# Altium PCB ScreenerMobo.PcbDoc (part 3 of 5)
Units mm, origin at the board's own origin, x right, y up, seen from the top; angles counter-clockwise.
Board outline 145 x 180 mm, 2 copper layers (Top Layer, Bottom Layer); 434 components, 355 nets, 1806 pads, 3000 vias.
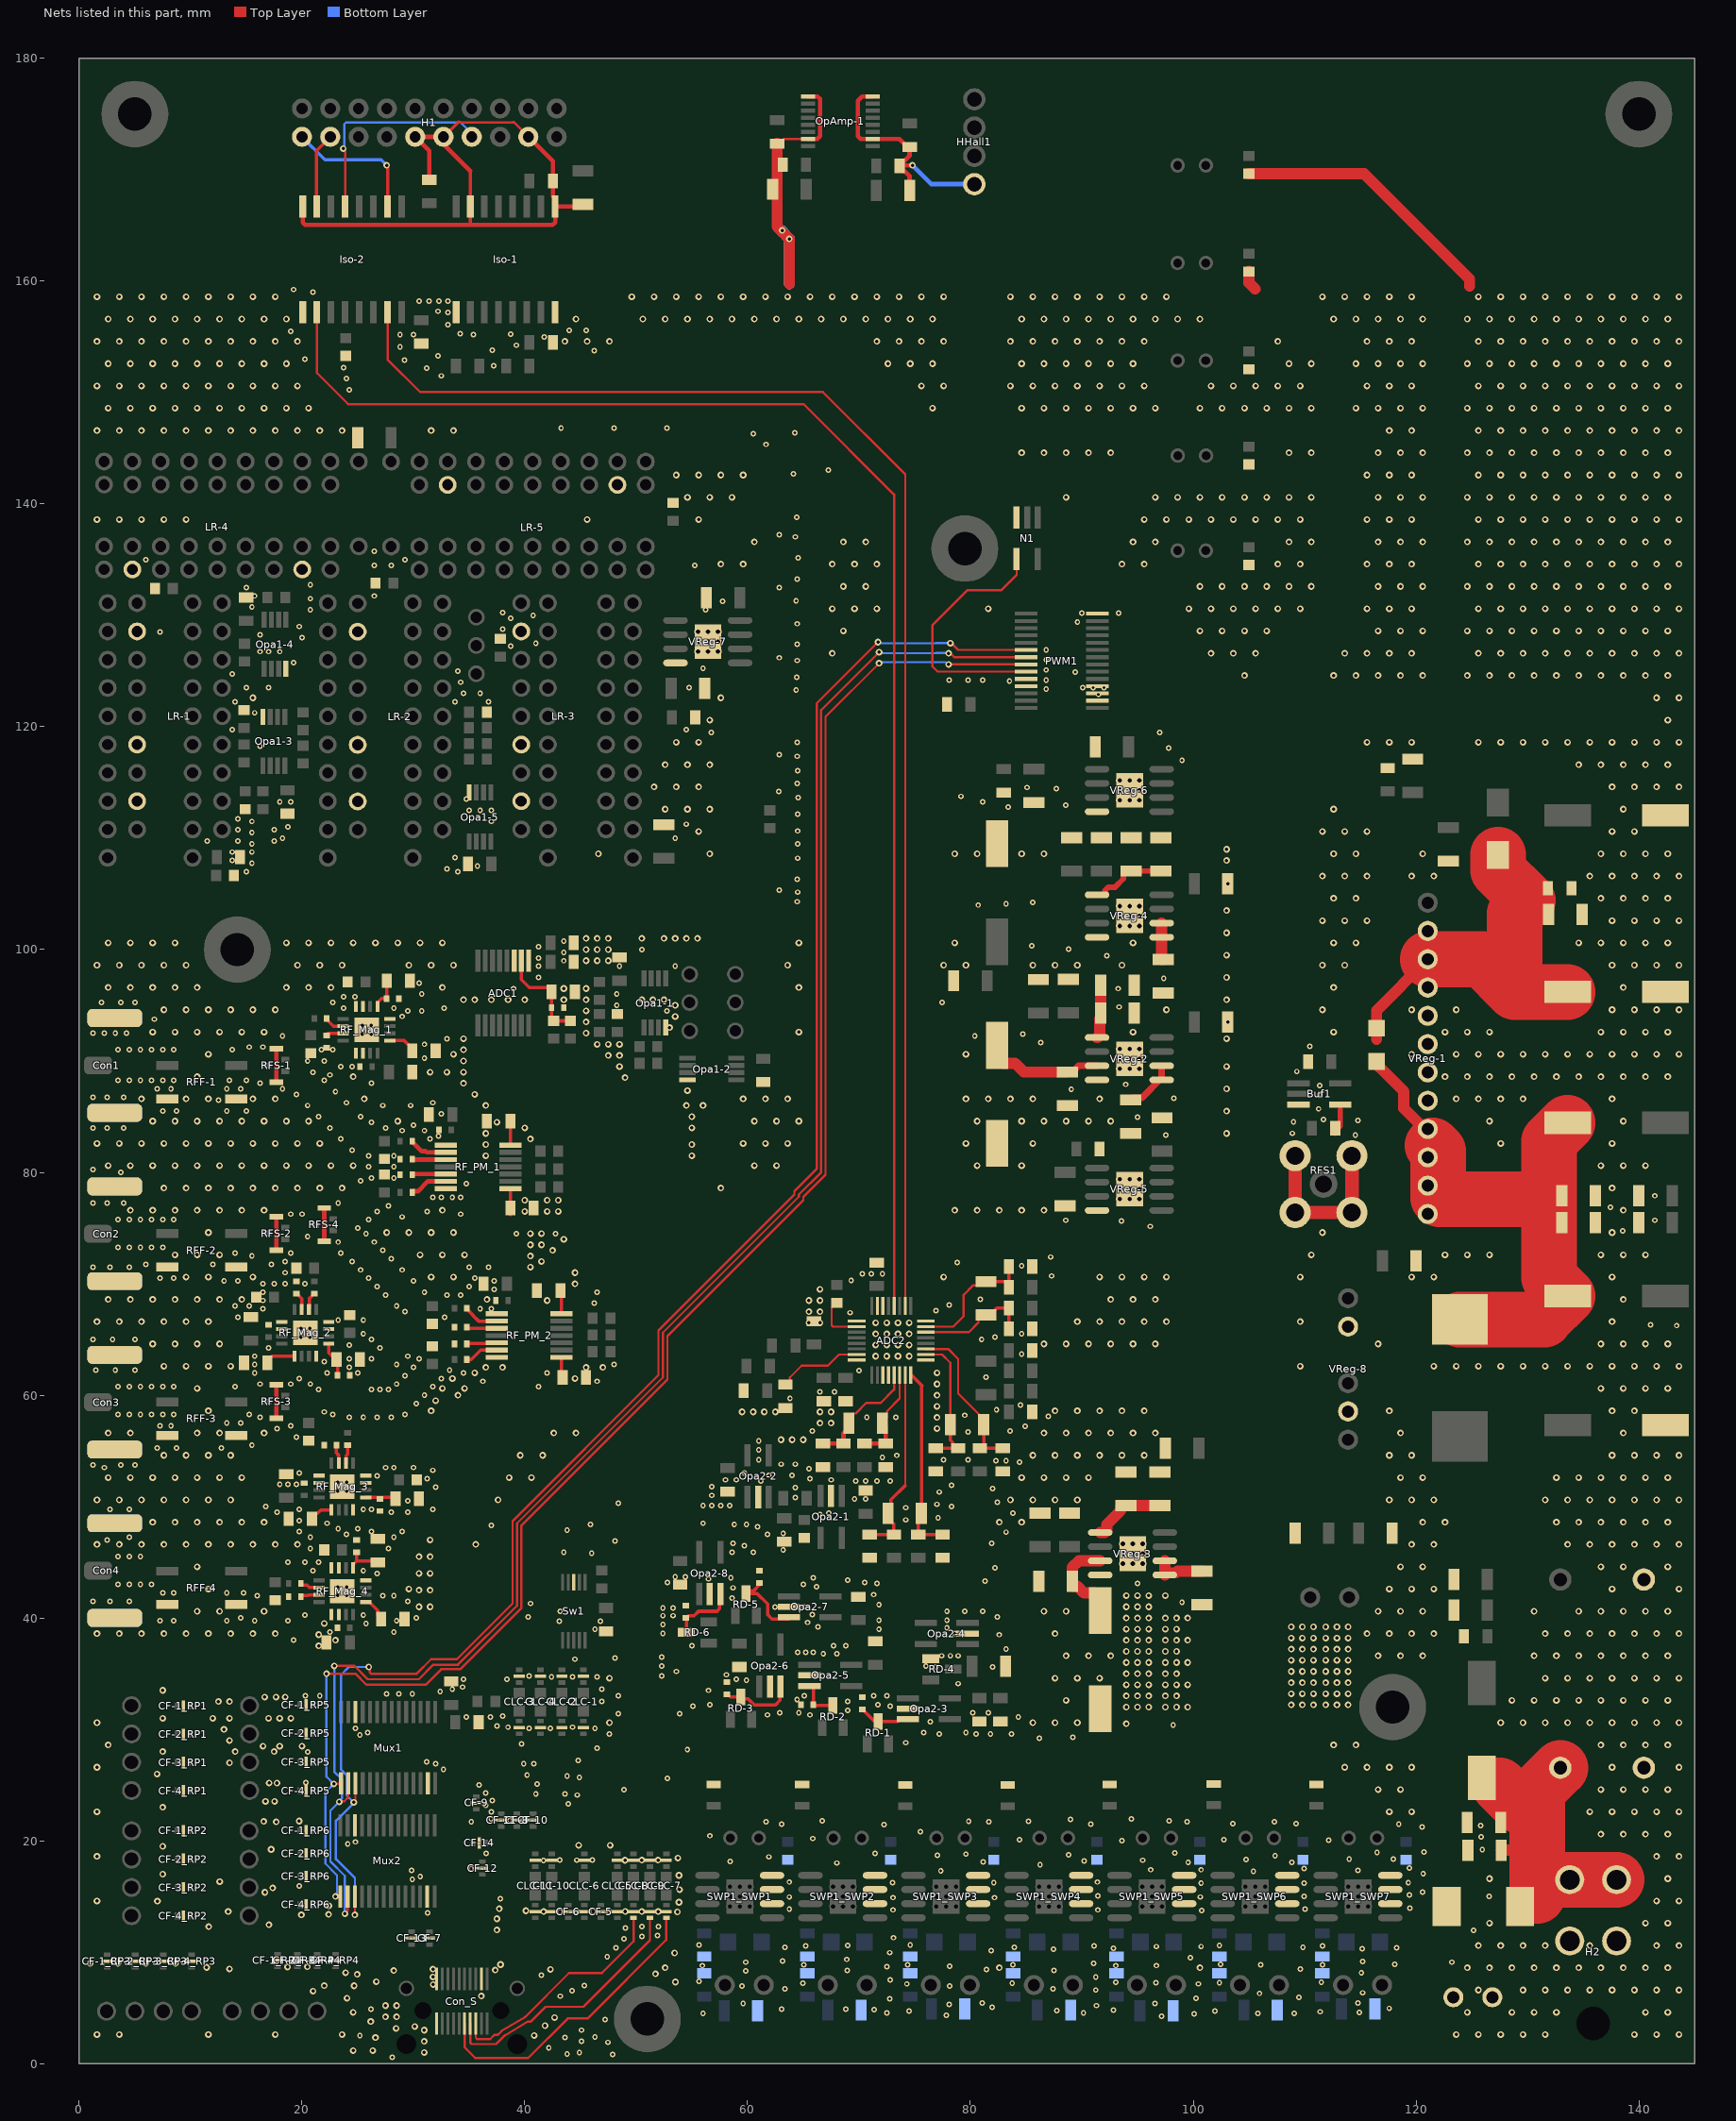
[diagram p3: the nets of this part, all layers, seen from the top]

## Via types
v1: diameter 0.6, hole 0.3, Top Layer to Bottom Layer, tented both sides, 1967 vias
v2: diameter 0.5, hole 0.25, Top Layer to Bottom Layer, tented both sides, 1025 vias
v3: diameter 0.9, hole 0.5, Top Layer to Bottom Layer, tented both sides, 8 vias

## Nets (pads, with @x,y where several pads share a name; then routed paths per layer and width w, separated by ;. In a path a pad name is that pad's centre, name@x,y a point inside that pad or via, vN(x,y) a via of type N, cw(c..) or ccw(c..) an arc to the next point about the centre after c; other vN are vias at no path point) (continued)
GND: ADC1.9 ADC1.11 ADC2.1 ADC2.8 ADC2.14 ADC2.15 ADC2.17 ADC2.24 ADC2.27 ADC2.28 Buf1.3 C1-2.2 C1-4.1 C1-5.1 C1-6.1 C1-7.1 C1-8.1 C1-9.1 C1-10.1 C1-11.2 C1-12.2 C1-13.2 C1-14.2 C1-15.1 C1-16.1 C1-17.2 C1-18.2 C1-18_SWP1.2 C1-18_SWP2.2 C1-18_SWP3.2 C1-18_SWP4.2 C1-18_SWP5.2 C1-18_SWP6.2 C1-18_SWP7.2 C1-18B_SWP1.2 C1-18B_SWP2.2 C1-18B_SWP3.2 C1-18B_SWP4.2 C1-18B_SWP5.2 C1-18B_SWP6.2 C1-18B_SWP7.2 C1-19.2 C1-20.2 C1-21.2 C1-22.2 C1-23.2 C1-24.2 C1-25.2 C1-26.2 C1-27.1 C1-28.1 C1-29.1 C1-30.1 C1-31.1 C1-32.1 C1-33.1 C1-34.2 C1-35.2 C1-36.1 C1-37.2 C1-38.2 C1-39.2 C1-40.2 C1-41.2 C1-42.2 C1-43.2 C1-44.1 C2-21.1 C3-1.1 C3-2.1 C3-4.1 C3-5.1 C3-7.1 C3-8.1 C3-10.1 C3-11.1 C3-13.2 C3-14.2 C3-15.2 C3-16.2 C3-18.1 C3-19.1 C3-21.1 C3-22.1 C3-24.1 C3-25.1 C3-28.2 C3-29.2 C3-30.2 C3-31.2 C3-32.2 C4-1.1 C4-2.1 C4-3.1 C4-4.1 C4-5.2 C4-6.1 C4-7.2 C4-8.1 C4-10.1 C5-1.1 C5-2.1 C5-3_SWP1.1 C5-3_SWP2.1 C5-3_SWP3.1 C5-3_SWP4.1 C5-3_SWP5.1 C5-3_SWP6.1 C5-3_SWP7.1 C5-5.1 C5-6.1 C5-7.1 C5-8.1 C5-9.1 C5-10.1 C5-11.1 C5-12.1 C5-13.1 C5-14.2 C5-16.2 C5-17.2 C5-18.2 C5-19.2 C5-20.2 C5-21.2 C5-22.1 C5-23.1 C5-24.1 C6-1.2 C6-2.2 C6-3.2 C6-4.1 C6-5.1 C6-6.1 C6-7.2 C6-8.2 C6-9.1 C6-10.1 C6-11.1 C6-12.2 C6-13.2 C6-14.2 C6-15.2 C6-16.1 C6-17.1 C6-18.1 C6-19.1 C6-20.1 C6-21.1 C7-1.1 C7-2.2 C8-1.2 C8-2.2 C8-3.2 C8-4.2 C8-5.2 C8-6.2 C8-7.2 C8-8.2 C8-9.2 C8-10.2 C8-11.2 C8-13.2 C8-14.2 C8-15.2 C9-3.2 CE1-1.2 CE2-1.2 CE3-1.2 CE3-4.2 CE3-5.2 CE3-6.2 CE3-7.2 CE3-8.2 CF-1_RP1.3 CF-1_RP2.3 CF-1_RP3.3 CF-1_RP4.3 CF-1_RP5.3 CF-1_RP6.3 CF-2_RP1.3 CF-2_RP2.3 CF-2_RP3.3 CF-2_RP4.3 CF-2_RP5.3 CF-2_RP6.3 CF-3_RP1.3 CF-3_RP2.3 CF-3_RP3.3 CF-3_RP4.3 CF-3_RP5.3 CF-3_RP6.3 CF-4_RP1.3 CF-4_RP2.3 CF-4_RP3.3 CF-4_RP4.3 CF-4_RP5.3 CF-4_RP6.3 CF-5.3 CF-6.3 CF-7.3 CF-8.3 CF-9.3 CF-10.3 CF-11.3 CF-12.3 CF-13.3 CF-14.3 CLC-1.3 CLC-2.3 CLC-3.3 CLC-4.3 CLC-5.3 CLC-6.3 CLC-7.3 CLC-8.3 CLC-9.3 CLC-10.3 CLC-11.3 Con1.2 Con2.2 Con3.2 Con4.2 Con_S.4 Con_S.19 Con_S.20 H2.1 H2.2 HP-2.1 HP-2.2 Iso-1.9 Iso-1.16 Iso-2.9 LR-1.2 LR-1.4 LR-1.8 LR-2.2 LR-2.4 LR-2.8 LR-3.2 LR-3.4 LR-3.8 LR-4.2 LR-4.8 LR-5.2 LR-5.8 Mux1.12 Mux1.27 Mux2.12 Mux2.27 N1.3 Opa1-1.4 Opa1-2.4 Opa1-3.4 Opa1-4.4 Opa1-5.4 Opa2-1.2 Opa2-2.2 Opa2-3.2 Opa2-4.2 Opa2-5.2 Opa2-6.2 Opa2-7.2 Opa2-8.2 OpAmp-1.9 OpAmp-1.15 PWM1.2 PWM1.3 PWM1.4 PWM1.14 PWM1.24 PWM1.25 R1-1.1 R1-2.1 R1-5.1 R1-10.2 R1-18.2 R2-1.2 R2-2.2 R2-3.2 R2-4.2 R2-5.2 R2-6.1 R2-7.2 R2-8.1 R3-1.1 R3-2.1 R3-3.1 R3-4.1 R3-5.1 R6-1_SWP1.1 R6-1_SWP2.1 R6-1_SWP3.1 R6-1_SWP4.1 R6-1_SWP5.1 R6-1_SWP6.1 R6-1_SWP7.1 R7-1.2 R7-2.2 R8-1.1 R8-2.1 R8-3.1 R8-4.1 R8-5.1 R8-6.2 R10-1.2 R10-1_SWP1.1 R10-1_SWP2.1 R10-1_SWP3.1 R10-1_SWP4.1 R10-1_SWP5.1 R10-1_SWP6.1 R10-1_SWP7.1 R10-2.1 R10-3.1 R10-4.1 R10-6.1 RD-4.1 RF_Mag_1.1 RF_Mag_1.2 RF_Mag_1.8 RF_Mag_1.11 RF_Mag_1.12 RF_Mag_1.17 RF_Mag_2.1 RF_Mag_2.2 RF_Mag_2.8 RF_Mag_2.11 RF_Mag_2.12 RF_Mag_2.17 RF_Mag_3.1 RF_Mag_3.2 RF_Mag_3.8 RF_Mag_3.11 RF_Mag_3.12 RF_Mag_3.17 RF_Mag_4.1 RF_Mag_4.2 RF_Mag_4.8 RF_Mag_4.11 RF_Mag_4.12 RF_Mag_4.17 RF_PM_1.1 RF_PM_1.7 RF_PM_2.1 RF_PM_2.7 RFF-1.2 RFF-1.3 RFF-2.2 RFF-2.3 RFF-3.2 RFF-3.3 RFF-4.2 RFF-4.3 RFS1.2 RFS-1.4 RFS-2.4 RFS-3.4 RFS-4.4 Sw1.3 SWP1_SWP1.6 SWP1_SWP1.7 SWP1_SWP1.8 SWP1_SWP2.6 SWP1_SWP2.7 SWP1_SWP2.8 SWP1_SWP3.6 SWP1_SWP3.7 SWP1_SWP3.8 SWP1_SWP4.6 SWP1_SWP4.7 SWP1_SWP4.8 SWP1_SWP5.6 SWP1_SWP5.7 SWP1_SWP5.8 SWP1_SWP6.6 SWP1_SWP6.7 SWP1_SWP6.8 SWP1_SWP7.6 SWP1_SWP7.7 SWP1_SWP7.8 TVS1.1 VReg-1.5 VReg-1.6 VReg-1.7 VReg-1.8 VReg-2.0 VReg-2.4 VReg-3.0 VReg-3.4 VReg-4.0 VReg-4.4 VReg-5.0 VReg-5.4 VReg-6.0 VReg-6.4 VReg-7.0 VReg-7.4 VReg-8.2 VReg-8.5 | length 52.9
  Top Layer w0.2: C8-15.2@62.65,172.35 62.85,172.35 63.275,172.775 OpAmp-1.15@65.408,172.775
  Top Layer w0.4: OpAmp-1.15@65.408,172.775 66.266,172.775 66.5,173.009 66.5,176.351 66.266,176.585 OpAmp-1.9@65.408,176.585
  Top Layer w1: C8-15.2@62.65,172.35 62.65,164.9 v1(63.75,163.8) 63.75,159.75 ; R10-6.1@105,160.875 105,159.85 105.55,159.3 ; R8-6.2@105,169.65 115.35,169.65 124.8,160.2 124.8,159.55
  Bottom Layer w1: v1(63.1,164.55) 63.1,164.45 v1(63.75,163.8) 63.75,159.75
  other v1: 30.975,1 24.599,1.159 26.352,1.168 30.975,2 26.6,2.325 40.85,2.525 1.6,2.6 3.6,2.6 11.6,2.6 17.6,2.6 23.6,2.6 123.6,2.6 125.6,2.6 127.6,2.6 129.6,2.6 131.6,2.6 139.6,2.6 141.6,2.6 143.6,2.6 30.975,3 28.45,3.15 30.125,3.325 41.825,3.4 26.175,3.775 42.675,4.125 27.5,4.2 28.5,4.2 24.6,4.6 124.6,4.6 128.6,4.6 130.6,4.6 132.6,4.6 140.6,4.6 142.6,4.6 27.5,5.2 28.5,5.2 24.05,5.875 36.098,6.057 21,6.5 125.6,6.6 129.6,6.6 131.6,6.6 133.6,6.6 135.6,6.6 137.6,6.6 139.6,6.6 141.6,6.6 143.6,6.6 24.686,6.983 22,7 31.775,7.1 53.521,7.319 26.674,7.359 31.747,7.779 24.949,8.002 51.725,8.05 23.925,8.162 28.236,8.352 37.347,8.396 31.752,8.469 42.3,8.45 13.5,8.5 52.6,8.6 82.6,8.6 100.6,8.6 124.6,8.6 126.6,8.6 128.6,8.6 130.6,8.6 132.6,8.6 134.6,8.6 136.6,8.6 138.6,8.6 140.6,8.6 142.6,8.6 11.439,8.636 18.71,8.677 20.482,8.686 37.828,8.886 1,9 3.5,9 6,9 8.661,9.008 53.45,9.925 125.6,10.6 127.6,10.6 129.6,10.6 131.6,10.6 135.6,10.6 141.6,10.6 143.6,10.6 37.5,12 11.625,12.295 17.039,12.461 126.6,12.6 140.6,12.6 142.6,12.6 37.5,13 19.945,13.355 22.396,13.384 53.704,13.612 13.378,13.649 41.689,13.646 43.171,13.639 47.56,13.649 50.498,13.637 51.976,13.647 44.602,13.658 46.112,13.655 49.018,13.653 40.107,13.718 37.713,13.906 22.4,14.167 53.838,14.481 7.021,14.572 1.6,14.6 141.6,14.6 143.6,14.6 16.67,15.369 53.898,15.609 17.372,15.764 12.617,16.326 126.6,16.6 142.6,16.6 53.838,16.896 7.5,17 49.005,18.253 50.499,18.26 51.97,18.265 53.747,18.455 1.6,18.6 141.6,18.6 143.6,18.6 17.235,19.223 7.5,19.5 44.838,19.589 47.659,19.594 136.6,20.6 138.6,20.6 140.6,20.6 142.6,20.6 17.686,21.692 16.561,21.744 19.747,21.764 1.6,22.6 117.6,22.6 119.6,22.6 135.6,22.6 137.6,22.6 139.6,22.6 141.6,22.6 143.6,22.6 7.5,23 16.729,23.541 17.548,23.541 116.6,24.6 118.6,24.6 136.6,24.6 138.6,24.6 140.6,24.6 142.6,24.6 17.752,25.178 17.049,25.191 7,26 1.6,26.6 113.6,26.6 115.6,26.6 117.6,26.6 119.6,26.6 137.6,26.6 143.6,26.6 13.5,27 7.5,28 14,28 17.5,28 16.5,28.5 18,28.5 20,28.5 2.6,28.6 112.6,28.6 114.6,28.6 136.6,28.6 138.6,28.6 140.6,28.6 142.6,28.6 13.5,29 13,30 94,30.5 1.6,30.6 47.6,30.6 85.6,30.6 87.6,30.6 89.6,30.6 127.6,30.6 129.6,30.6 131.6,30.6 133.6,30.6 135.6,30.6 137.6,30.6 139.6,30.6 141.6,30.6 143.6,30.6 7.5,31 12,31 13.5,31 17,31 18,31 19,31 94,32 95,32 96,32 97.5,32 98.5,32 99.5,32 108.8,32.2 109.8,32.2 110.8,32.2 111.9,32.2 112.9,32.2 113.9,32.2 12.5,32.5 13.5,32.5 88.6,32.6 128.6,32.6 130.6,32.6 132.6,32.6 134.6,32.6 136.6,32.6 138.6,32.6 140.6,32.6 142.6,32.6 16.653,32.898 17.666,32.906 18.492,32.906 94,33 95,33 96,33 97.5,33 98.5,33 108.8,33.2 109.8,33.2 110.8,33.2 111.9,33.2 112.9,33.2 113.9,33.2 7.5,33.5 94,34 95,34 96,34 97.5,34 98.5,34 99.5,34 108.8,34.2 109.8,34.2 110.8,34.2 111.9,34.2 112.9,34.2 113.9,34.2 47.6,34.6 87.6,34.6 89.6,34.6 91.6,34.6 131.6,34.6 133.6,34.6 135.6,34.6 137.6,34.6 139.6,34.6 141.6,34.6 143.6,34.6 94,35 95,35 96,35 97.5,35 98.5,35 108.8,35.2 109.8,35.2 110.8,35.2 111.9,35.2 112.9,35.2 113.9,35.2 94,36 95,36 96,36 97.5,36 98.5,36 99.5,36 108.8,36.2 109.8,36.2 110.8,36.2 111.9,36.2 112.9,36.2 113.9,36.2 88.6,36.6 90.6,36.6 92.6,36.6 116.6,36.6 118.6,36.6 120.6,36.6 130.6,36.6 132.6,36.6 134.6,36.6 136.6,36.6 138.6,36.6 140.6,36.6 142.6,36.6 94,37 95,37 96,37 97.5,37 98.5,37 108.8,37.2 109.8,37.2 110.8,37.2 111.9,37.2 112.9,37.2 113.9,37.2 21.5,37.5 23,38 94,38 95,38 96,38 97.5,38 98.5,38 99.5,38 108.8,38.2 109.8,38.2 110.8,38.2 111.9,38.2 112.9,38.2 113.9,38.2 21.5,38.5 1.6,38.6 3.6,38.6 5.6,38.6 7.6,38.6 9.6,38.6 11.6,38.6 13.6,38.6 15.6,38.6 17.6,38.6 87.6,38.6 115.6,38.6 117.6,38.6 119.6,38.6 121.6,38.6 131.6,38.6 133.6,38.6 135.6,38.6 137.6,38.6 139.6,38.6 141.6,38.6 143.6,38.6 94,39 95,39 96,39 97.5,39 98.5,39 108.8,39.2 109.8,39.2 110.8,39.2 111.9,39.2 112.9,39.2 113.9,39.2 22,39.5 94,40 95,40 96,40 97.5,40 98.5,40 99.5,40 10.6,40.6 12.6,40.6 16.6,40.6 86.6,40.6 88.6,40.6 116.6,40.6 118.6,40.6 120.6,40.6 130.6,40.6 134.6,40.6 136.6,40.6 138.6,40.6 140.6,40.6 142.6,40.6 30.5,41 31.5,41 94,41 95,41 96,41 94,42 95,42 96,42 97.5,42 30.5,42.5 31.5,42.5 11.6,42.6 29.6,42.6 117.6,42.6 119.6,42.6 121.6,42.6 137.6,42.6 143.6,42.6 30.5,44 31.5,44 10.6,44.6 118.6,44.6 120.6,44.6 136.6,44.6 138.6,44.6 142.6,44.6 30.5,45.5 31.5,45.5 1.6,46.6 3.6,46.6 5.6,46.6 7.6,46.6 9.6,46.6 11.6,46.6 13.6,46.6 15.6,46.6 17.6,46.6 19.6,46.6 35.6,46.6 119.6,46.6 121.6,46.6 133.6,46.6 135.6,46.6 137.6,46.6 139.6,46.6 141.6,46.6 143.6,46.6 31.5,47 6.6,48.6 8.6,48.6 10.6,48.6 12.6,48.6 14.6,48.6 16.6,48.6 82.6,48.6 84.6,48.6 120.6,48.6 122.6,48.6 132.6,48.6 134.6,48.6 136.6,48.6 138.6,48.6 140.6,48.6 142.6,48.6 1.6,50.6 3.6,50.6 5.6,50.6 7.6,50.6 9.6,50.6 11.6,50.6 13.6,50.6 37.6,50.6 83.6,50.6 85.6,50.6 87.6,50.6 89.6,50.6 117.6,50.6 119.6,50.6 121.6,50.6 131.6,50.6 133.6,50.6 135.6,50.6 137.6,50.6 139.6,50.6 141.6,50.6 143.6,50.6 2.6,52.6 4.6,52.6 6.6,52.6 8.6,52.6 10.6,52.6 12.6,52.6 14.6,52.6 38.6,52.6 40.6,52.6 84.6,52.6 86.6,52.6 88.6,52.6 90.6,52.6 118.6,52.6 120.6,52.6 132.6,52.6 134.6,52.6 136.6,52.6 138.6,52.6 140.6,52.6 142.6,52.6 7.6,54.6 9.6,54.6 11.6,54.6 13.6,54.6 39.6,54.6 41.6,54.6 85.6,54.6 87.6,54.6 89.6,54.6 91.6,54.6 93.6,54.6 95.6,54.6 117.6,54.6 119.6,54.6 137.6,54.6 139.6,54.6 141.6,54.6 143.6,54.6 63,56 64,56 65,56 2.6,56.6 4.6,56.6 10.6,56.6 12.6,56.6 16.6,56.6 42.6,56.6 44.6,56.6 86.6,56.6 88.6,56.6 90.6,56.6 92.6,56.6 94.6,56.6 96.6,56.6 118.6,56.6 138.6,56.6 77,57 66.5,57.5 67.5,57.5 77,58 59.5,58.5 60.5,58.5 61.5,58.5 62.5,58.5 66.5,58.5 67.5,58.5 11.6,58.6 31.6,58.6 87.6,58.6 89.6,58.6 91.6,58.6 93.6,58.6 95.6,58.6 117.6,58.6 137.6,58.6 139.6,58.6 77,59 32,59.5 34,60 77,60 10.6,60.6 32.6,60.6 34.6,60.6 136.6,60.6 138.6,60.6 140.6,60.6 142.6,60.6 77,61 33.5,61.5 44.5,61.5 35.5,62 77,62 36.5,62.5 38,62.5 45.5,62.5 47,62.5 7.6,62.6 9.6,62.6 11.6,62.6 13.6,62.6 109.6,62.6 121.6,62.6 123.6,62.6 125.6,62.6 127.6,62.6 129.6,62.6 131.6,62.6 133.6,62.6 135.6,62.6 137.6,62.6 139.6,62.6 141.6,62.6 143.6,62.6 71.5,63.5 72.5,63.5 73.5,63.5 74.5,63.5 71.5,64.5 72.5,64.5 73.5,64.5 74.5,64.5 6.6,64.6 8.6,64.6 10.6,64.6 12.6,64.6 86.6,64.6 88.6,64.6 90.6,64.6 92.6,64.6 94.6,64.6 96.6,64.6 116.6,64.6 136.6,64.6 138.6,64.6 140.6,64.6 142.6,64.6 71.5,65.5 72.5,65.5 73.5,65.5 74.5,65.5 65.5,66.5 66.5,66.5 71.5,66.5 72.5,66.5 73.5,66.5 74.5,66.5 1.6,66.6 3.6,66.6 5.6,66.6 7.6,66.6 9.6,66.6 11.6,66.6 89.6,66.6 91.6,66.6 93.6,66.6 95.6,66.6 97.6,66.6 109.6,66.6 137.6,66.6 65.5,67.5 66.5,67.5 42,68.5 65.5,68.5 66.5,68.5 2.6,68.6 4.6,68.6 6.6,68.6 8.6,68.6 10.6,68.6 12.6,68.6 14.6,68.6 36.6,68.6 92.6,68.6 94.6,68.6 96.6,68.6 138.6,68.6 66.5,69.5 44.5,70 9.6,70.6 11.6,70.6 15.6,70.6 31.6,70.6 33.6,70.6 77.6,70.6 91.6,70.6 93.6,70.6 95.6,70.6 97.6,70.6 109.6,70.6 119.6,70.6 121.6,70.6 137.6,70.6 44.5,71 40.5,71.5 41.5,72 40.5,72.5 8.6,72.6 10.6,72.6 12.6,72.6 30.6,72.6 32.6,72.6 34.6,72.6 110.6,72.6 122.6,72.6 124.6,72.6 126.6,72.6 136.6,72.6 138.6,72.6 140.6,72.6 42.5,73 40.5,73.5 41.5,73.5 43.5,74 40.5,74.5 41.5,74.5 11.6,74.6 27.6,74.6 29.6,74.6 31.6,74.6 33.6,74.6 111.6,74.6 137.6,74.6 40,76.5 42,76.5 43,76.5 4.6,76.6 6.6,76.6 8.6,76.6 10.6,76.6 12.6,76.6 14.6,76.6 16.6,76.6 32.6,76.6 78.6,76.6 80.6,76.6 82.6,76.6 84.6,76.6 86.6,76.6 138.6,76.6 40,77.5 42,77.5 43,77.5 7.6,78.6 9.6,78.6 11.6,78.6 13.6,78.6 15.6,78.6 17.6,78.6 19.6,78.6 21.6,78.6 23.6,78.6 57.6,78.6 137.6,78.6 2.6,80.6 4.6,80.6 6.6,80.6 8.6,80.6 10.6,80.6 12.6,80.6 14.6,80.6 16.6,80.6 18.6,80.6 20.6,80.6 22.6,80.6 24.6,80.6 60.6,80.6 62.6,80.6 80.6,80.6 84.6,80.6 136.6,80.6 138.6,80.6 140.6,80.6 36.5,81.5 55,81.5 36.5,82.5 55,82.5 1.6,82.6 3.6,82.6 5.6,82.6 7.6,82.6 9.6,82.6 11.6,82.6 13.6,82.6 15.6,82.6 17.6,82.6 19.6,82.6 21.6,82.6 59.6,82.6 61.6,82.6 63.6,82.6 79.6,82.6 85.6,82.6 127.6,82.6 137.6,82.6 40.5,83 36.5,83.5 103,83.5 40,84 55,84 37.5,84.5 6.6,84.6 8.6,84.6 10.6,84.6 12.6,84.6 14.6,84.6 16.6,84.6 18.6,84.6 20.6,84.6 28.6,84.6 60.6,84.6 62.6,84.6 64.6,84.6 80.6,84.6 84.6,84.6 86.6,84.6 88.6,84.6 90.6,84.6 92.6,84.6 126.6,84.6 138.6,84.6 55,85 103,85.5 36.5,86 54.5,86 56,86 5.6,86.6 9.6,86.6 11.6,86.6 15.6,86.6 17.6,86.6 25.6,86.6 59.6,86.6 61.6,86.6 63.6,86.6 79.6,86.6 81.6,86.6 83.6,86.6 85.6,86.6 91.6,86.6 123.6,86.6 125.6,86.6 127.6,86.6 129.6,86.6 137.6,86.6 35.5,87 54.603,87.338 103,87.5 34.5,88 49,88.5 10.6,88.6 24.6,88.6 122.6,88.6 124.6,88.6 126.6,88.6 128.6,88.6 130.6,88.6 132.6,88.6 134.6,88.6 136.6,88.6 138.6,88.6 140.6,88.6 142.6,88.6 31.5,89 33,89 34.5,89 48.5,89.5 103,89.5 34.5,90 47.5,90.5 48.5,90.5 11.6,90.6 33.6,90.6 79.6,90.6 119.6,90.6 123.6,90.6 125.6,90.6 127.6,90.6 129.6,90.6 131.6,90.6 133.6,90.6 135.6,90.6 137.6,90.6 139.6,90.6 141.6,90.6 143.6,90.6 34.5,91 46.5,91.5 47.5,91.5 48.5,91.5 34.5,92 103,92 45.5,92.5 6.6,92.6 8.6,92.6 10.6,92.6 12.6,92.6 14.6,92.6 16.6,92.6 64.6,92.6 94.6,92.6 112.6,92.6 122.6,92.6 124.6,92.6 126.6,92.6 136.6,92.6 138.6,92.6 140.6,92.6 142.6,92.6 53,93 45.5,93.5 103.1,93.5 53.5,94 45.5,94.5 7.6,94.6 9.6,94.6 11.6,94.6 13.6,94.6 15.6,94.6 17.6,94.6 97.6,94.6 111.6,94.6 119.6,94.6 123.6,94.6 137.6,94.6 139.6,94.6 141.6,94.6 143.6,94.6 53.5,95 34.5,95.5 35.5,95.5 37,95.5 38.5,95.5 40,95.5 43.5,95.5 45.5,95.5 50.5,95.5 51.5,95.5 52.5,95.5 103,95.5 43.5,96.5 45.5,96.5 2.6,96.6 4.6,96.6 6.6,96.6 8.6,96.6 10.6,96.6 18.6,96.6 20.6,96.6 22.6,96.6 32.6,96.6 64.6,96.6 112.6,96.6 138.6,96.6 103,97.5 1.6,98.6 3.6,98.6 5.6,98.6 7.6,98.6 9.6,98.6 19.6,98.6 21.6,98.6 23.6,98.6 29.6,98.6 31.6,98.6 33.6,98.6 63.6,98.6 77.6,98.6 79.6,98.6 85.6,98.6 87.6,98.6 89.6,98.6 93.6,98.6 111.6,98.6 113.6,98.6 137.6,98.6 139.6,98.6 141.6,98.6 143.6,98.6 45.5,99 46.5,99 47.5,99 103,99.5 45.5,100 46.5,100 47.5,100 2.6,100.6 4.6,100.6 6.6,100.6 8.6,100.6 18.6,100.6 20.6,100.6 22.6,100.6 24.6,100.6 26.6,100.6 28.6,100.6 30.6,100.6 32.6,100.6 64.6,100.6 78.6,100.6 94.6,100.6 112.6,100.6 114.6,100.6 134.6,100.6 136.6,100.6 138.6,100.6 140.6,100.6 142.6,100.6 45.5,101 46.5,101 47.5,101 50.5,101 52.5,101 53.5,101 54.5,101 55.5,101 103,101.5 111.6,102.6 113.6,102.6 115.6,102.6 137.6,102.6 139.6,102.6 141.6,102.6 143.6,102.6 103,103.5 112.6,104.6 114.6,104.6 136.6,104.6 138.6,104.6 140.6,104.6 142.6,104.6 103.1,105.9 111.6,106.6 113.6,106.6 115.6,106.6 119.6,106.6 121.6,106.6 135.6,106.6 137.6,106.6 139.6,106.6 141.6,106.6 143.6,106.6 103,108 46.6,108.6 56.6,108.6 78.6,108.6 80.6,108.6 84.6,108.6 86.6,108.6 112.6,108.6 114.6,108.6 120.6,108.6 136.6,108.6 138.6,108.6 140.6,108.6 142.6,108.6 103,109 55.6,110.6 111.6,110.6 113.6,110.6 115.6,110.6 137.6,110.6 139.6,110.6 52.6,112.6 54.6,112.6 56.6,112.6 112.6,112.6 138.6,112.6 51.6,114.6 53.6,114.6 55.6,114.6 137.6,114.6 139.6,114.6 141.6,114.6 143.6,114.6 52.6,116.6 54.6,116.6 56.6,116.6 134.6,116.6 136.6,116.6 138.6,116.6 140.6,116.6 142.6,116.6 53.6,118.6 55.6,118.6 115.6,118.6 117.6,118.6 119.6,118.6 125.6,118.6 127.6,118.6 129.6,118.6 131.6,118.6 133.6,118.6 135.6,118.6 137.6,118.6 139.6,118.6 141.6,118.6 143.6,118.6 56.6,120.6 142.6,120.6 15.6,122.6 57.6,122.6 141.6,122.6 143.6,122.6 104.6,124.6 112.6,124.6 114.6,124.6 116.6,124.6 118.6,124.6 120.6,124.6 124.6,124.6 126.6,124.6 128.6,124.6 130.6,124.6 132.6,124.6 134.6,124.6 136.6,124.6 138.6,124.6 140.6,124.6 142.6,124.6 67.6,126.6 101.6,126.6 103.6,126.6 105.6,126.6 113.6,126.6 115.6,126.6 117.6,126.6 119.6,126.6 125.6,126.6 127.6,126.6 129.6,126.6 131.6,126.6 133.6,126.6 135.6,126.6 137.6,126.6 139.6,126.6 141.6,126.6 143.6,126.6 68.6,128.6 100.6,128.6 102.6,128.6 104.6,128.6 106.6,128.6 116.6,128.6 118.6,128.6 120.6,128.6 124.6,128.6 126.6,128.6 128.6,128.6 130.6,128.6 132.6,128.6 134.6,128.6 136.6,128.6 138.6,128.6 140.6,128.6 142.6,128.6 67.6,130.6 69.6,130.6 71.6,130.6 81.6,130.6 99.6,130.6 101.6,130.6 103.6,130.6 105.6,130.6 107.6,130.6 109.6,130.6 115.6,130.6 117.6,130.6 119.6,130.6 125.6,130.6 127.6,130.6 129.6,130.6 131.6,130.6 133.6,130.6 135.6,130.6 137.6,130.6 139.6,130.6 141.6,130.6 143.6,130.6 68.6,132.6 70.6,132.6 100.6,132.6 102.6,132.6 104.6,132.6 106.6,132.6 108.6,132.6 110.6,132.6 116.6,132.6 118.6,132.6 120.6,132.6 124.6,132.6 126.6,132.6 128.6,132.6 130.6,132.6 132.6,132.6 134.6,132.6 136.6,132.6 138.6,132.6 140.6,132.6 142.6,132.6 57.6,134.6 59.6,134.6 67.6,134.6 69.6,134.6 71.6,134.6 93.6,134.6 95.6,134.6 107.6,134.6 109.6,134.6 115.6,134.6 117.6,134.6 119.6,134.6 125.6,134.6 127.6,134.6 129.6,134.6 131.6,134.6 133.6,134.6 135.6,134.6 137.6,134.6 139.6,134.6 141.6,134.6 143.6,134.6 60.6,136.6 68.6,136.6 70.6,136.6 94.6,136.6 96.6,136.6 108.6,136.6 110.6,136.6 116.6,136.6 118.6,136.6 120.6,136.6 124.6,136.6 126.6,136.6 128.6,136.6 130.6,136.6 132.6,136.6 134.6,136.6 136.6,136.6 138.6,136.6 140.6,136.6 142.6,136.6 1.6,138.6 3.6,138.6 5.6,138.6 7.6,138.6 9.6,138.6 45.6,138.6 55.6,138.6 95.6,138.6 97.6,138.6 99.6,138.6 101.6,138.6 103.6,138.6 105.6,138.6 107.6,138.6 109.6,138.6 115.6,138.6 117.6,138.6 119.6,138.6 125.6,138.6 127.6,138.6 129.6,138.6 131.6,138.6 133.6,138.6 135.6,138.6 137.6,138.6 139.6,138.6 141.6,138.6 143.6,138.6 54.6,140.6 56.6,140.6 58.6,140.6 88.6,140.6 96.6,140.6 98.6,140.6 100.6,140.6 102.6,140.6 104.6,140.6 106.6,140.6 108.6,140.6 110.6,140.6 116.6,140.6 118.6,140.6 120.6,140.6 124.6,140.6 126.6,140.6 128.6,140.6 130.6,140.6 132.6,140.6 134.6,140.6 136.6,140.6 138.6,140.6 140.6,140.6 142.6,140.6 53.6,142.6 55.6,142.6 57.6,142.6 59.6,142.6 115.6,142.6 117.6,142.6 119.6,142.6 125.6,142.6 127.6,142.6 129.6,142.6 131.6,142.6 133.6,142.6 135.6,142.6 137.6,142.6 139.6,142.6 141.6,142.6 143.6,142.6 84.6,144.6 86.6,144.6 88.6,144.6 90.6,144.6 92.6,144.6 108.6,144.6 110.6,144.6 116.6,144.6 118.6,144.6 120.6,144.6 124.6,144.6 126.6,144.6 128.6,144.6 130.6,144.6 132.6,144.6 134.6,144.6 136.6,144.6 138.6,144.6 140.6,144.6 142.6,144.6 1.6,146.6 3.6,146.6 5.6,146.6 7.6,146.6 9.6,146.6 11.6,146.6 13.6,146.6 15.6,146.6 17.6,146.6 19.6,146.6 21.6,146.6 23.6,146.6 31.6,146.6 33.6,146.6 117.6,146.6 119.6,146.6 125.6,146.6 127.6,146.6 129.6,146.6 131.6,146.6 133.6,146.6 135.6,146.6 137.6,146.6 139.6,146.6 141.6,146.6 143.6,146.6 2.6,148.6 4.6,148.6 6.6,148.6 8.6,148.6 10.6,148.6 12.6,148.6 14.6,148.6 16.6,148.6 18.6,148.6 20.6,148.6 76.6,148.6 84.6,148.6 86.6,148.6 88.6,148.6 90.6,148.6 92.6,148.6 94.6,148.6 96.6,148.6 100.6,148.6 102.6,148.6 104.6,148.6 106.6,148.6 108.6,148.6 110.6,148.6 114.6,148.6 116.6,148.6 118.6,148.6 120.6,148.6 124.6,148.6 126.6,148.6 128.6,148.6 130.6,148.6 132.6,148.6 134.6,148.6 136.6,148.6 138.6,148.6 140.6,148.6 142.6,148.6 1.6,150.6 3.6,150.6 5.6,150.6 7.6,150.6 9.6,150.6 11.6,150.6 13.6,150.6 15.6,150.6 17.6,150.6 19.6,150.6 75.6,150.6 77.6,150.6 83.6,150.6 85.6,150.6 87.6,150.6 89.6,150.6 91.6,150.6 93.6,150.6 95.6,150.6 101.6,150.6 103.6,150.6 105.6,150.6 107.6,150.6 109.6,150.6 115.6,150.6 117.6,150.6 119.6,150.6 125.6,150.6 127.6,150.6 129.6,150.6 131.6,150.6 133.6,150.6 135.6,150.6 137.6,150.6 139.6,150.6 141.6,150.6 143.6,150.6 2.6,152.6 4.6,152.6 6.6,152.6 8.6,152.6 10.6,152.6 12.6,152.6 14.6,152.6 16.6,152.6 18.6,152.6 72.6,152.6 74.6,152.6 76.6,152.6 84.6,152.6 86.6,152.6 88.6,152.6 90.6,152.6 92.6,152.6 94.6,152.6 108.6,152.6 110.6,152.6 114.6,152.6 116.6,152.6 118.6,152.6 120.6,152.6 124.6,152.6 126.6,152.6 128.6,152.6 130.6,152.6 132.6,152.6 134.6,152.6 136.6,152.6 138.6,152.6 140.6,152.6 142.6,152.6 1.6,154.6 3.6,154.6 5.6,154.6 7.6,154.6 9.6,154.6 11.6,154.6 13.6,154.6 15.6,154.6 17.6,154.6 19.6,154.6 43.6,154.6 45.6,154.6 47.6,154.6 71.6,154.6 73.6,154.6 75.6,154.6 77.6,154.6 83.6,154.6 85.6,154.6 87.6,154.6 89.6,154.6 91.6,154.6 93.6,154.6 95.6,154.6 107.6,154.6 115.6,154.6 117.6,154.6 119.6,154.6 125.6,154.6 127.6,154.6 129.6,154.6 131.6,154.6 133.6,154.6 135.6,154.6 137.6,154.6 139.6,154.6 141.6,154.6 143.6,154.6 2.6,156.6 4.6,156.6 6.6,156.6 8.6,156.6 10.6,156.6 12.6,156.6 14.6,156.6 16.6,156.6 18.6,156.6 44.6,156.6 50.6,156.6 52.6,156.6 54.6,156.6 56.6,156.6 58.6,156.6 60.6,156.6 62.6,156.6 64.6,156.6 66.6,156.6 68.6,156.6 70.6,156.6 72.6,156.6 74.6,156.6 76.6,156.6 84.6,156.6 86.6,156.6 88.6,156.6 90.6,156.6 92.6,156.6 94.6,156.6 96.6,156.6 98.6,156.6 100.6,156.6 112.6,156.6 114.6,156.6 116.6,156.6 118.6,156.6 120.6,156.6 124.6,156.6 126.6,156.6 128.6,156.6 130.6,156.6 132.6,156.6 134.6,156.6 136.6,156.6 138.6,156.6 140.6,156.6 142.6,156.6 1.6,158.6 3.6,158.6 5.6,158.6 7.6,158.6 9.6,158.6 11.6,158.6 13.6,158.6 15.6,158.6 17.6,158.6 49.6,158.6 51.6,158.6 53.6,158.6 55.6,158.6 57.6,158.6 59.6,158.6 61.6,158.6 63.6,158.6 65.6,158.6 67.6,158.6 69.6,158.6 71.6,158.6 73.6,158.6 75.6,158.6 77.6,158.6 83.6,158.6 85.6,158.6 87.6,158.6 89.6,158.6 91.6,158.6 93.6,158.6 95.6,158.6 97.6,158.6 111.6,158.6 113.6,158.6 115.6,158.6 117.6,158.6 119.6,158.6 125.6,158.6 127.6,158.6 129.6,158.6 131.6,158.6 133.6,158.6 135.6,158.6 137.6,158.6 139.6,158.6 141.6,158.6 143.6,158.6
  other v2: 28.1,0.55 47.9,0.8 43.8,0.85 44.9,1 42.15,1.4 47.45,1.9 45.1,2 43.6,2.35 46.3,2.4 25.2,2.5 45.1,3 47.2,3.95 97.15,4.25 77.85,4.35 100.1,4.45 56,4.5 105.8,4.5 109.05,4.5 72.5,4.55 90.15,4.55 114.9,4.6 111.4,4.65 74.5,4.7 101.95,4.7 87.75,4.75 92.85,4.8 71.35,4.85 26.2,4.9 63.05,4.9 68.8,4.9 117.6,4.95 81.95,5.05 91.3,5.2 78.1,5.3 59.6,5.4 96.55,5.4 81.05,5.45 114.8,5.45 72.75,5.8 100.25,5.85 109.5,5.95 43.2,6.05 105.95,6.3 115.2,6.35 44.25,6.55 91.25,6.6 63.35,6.7 87.4,6.7 59.5,6.95 78.15,6.95 45.35,7 74.3,7.15 100.45,7.15 64.95,7.2 83.75,7.2 96.65,7.25 102.35,7.25 93.05,7.3 111.5,7.3 55.65,7.4 72.8,7.5 91.25,7.75 41.5,7.95 115.1,8.15 59.85,8.3 68.95,8.35 87.5,8.35 81.45,8.45 109.6,8.5 72.5,8.7 78.15,8.75 55.95,8.8 93.05,8.8 96.7,8.8 65.05,8.85 74.35,8.85 83.8,8.85 106.05,8.85 111.6,8.85 102.45,8.9 118.1,8.9 91.05,9 59.85,9.1 123.2,9.1 115.2,9.15 63.15,9.2 68.9,9.35 99.75,9.5 47.4,9.6 72.75,9.95 81.85,10.15 87.45,10.25 115.15,10.3 92.85,10.35 48.2,10.4 118.25,10.4 63.35,10.45 83.95,10.45 109.85,10.45 96.7,10.5 100.7,10.5 65.2,10.55 91.1,10.55 111.6,10.55 69,10.6 102.35,10.6 55.65,10.65 74.6,10.65 48.9,11.2 73.1,11.3 50.5,11.4 51.9,11.5 125.15,11.95 49.02,12.188 50.5,12.3 52,12.3 31.273,13.513 100.75,13.75 73.05,13.8 91.45,13.8 63.75,13.85 110.05,13.85 119.45,13.95 37.8,14.8 73.05,14.9 82.15,14.9 63.75,14.95 100.65,14.95 109.95,15 126.55,15 91.45,15.05 119.4,15.15 120.6,15.4 19.759,15.93 100.7,16.2 109.95,16.2 73,16.25 82.1,16.25 119.3,16.25 63.75,16.3 91.4,16.3 29.901,16.529 30.619,16.78 120.65,17.05 105.4,17.25 77.35,17.3 29.833,17.343 114.8,17.35 96.2,17.4 100.7,17.4 35.2,17.5 109.95,17.5 119.4,17.55 86.25,17.85 68,18 99.55,18.05 108.85,18.05 81.15,18.1 58.45,18.15 90.2,18.2 41.681,18.244 43.133,18.264 44.658,18.254 46.071,18.269 95.45,18.25 104.75,18.3 114,18.35 117.95,18.35 61.9,18.55 107.35,18.65 77.05,18.7 88.8,18.75 79.6,18.8 36.546,18.851 71.45,18.85 98.35,18.9 116.5,18.95 120.7,19 125.95,19.2 24.1,19.7 24.8,19.9 93.6,20 112.15,20.05 84.4,20.1 102.75,20.1 65.85,20.2 125.85,20.35 56.6,20.45 75.5,20.8 120.55,21.25 125.8,21.35 72.25,21.45 63.05,21.5 90.8,21.5 118.45,21.5 103.55,21.55 109.25,21.55 35.2,21.7 61.65,21.7 81.65,21.7 99.45,21.7 107.3,21.7 79.85,21.75 85.2,21.75 66.7,21.8 97.85,21.8 38.637,21.849 89,21.9 36.979,21.951 94.45,21.95 37,22.6 36.5,23.2 43.9,23.3 37.1,23.6 44.7,24.1 41,24.2 43.6,24.2 36.5,24.3 48.9,24.6 35.9,25 41.1,25.1 20.348,25.204 52.8,25.6 44.9,25.7 43.8,25.8 40.2,25.9 32.7,26.4 32,26.9 39.9,26.9 40.8,26.9 31.2,27.1 44.8,27.2 20.511,27.98 54.6,28.2 46.5,28.3 39.7,28.7 74.2,28.8 86.2,29.2 89.2,29.3 25.2,29.5 47.6,29.6 77.2,29.6 80.5,29.6 81.8,29.6 83.7,29.6 25.9,29.7 75.8,29.7 79.6,29.7 24.8,30.1 40.4,30.1 42.3,30.1 46.3,30.1 38.5,30.2 44.3,30.2 37.5,30.3 98.2,30.4 76.4,30.7 34.75,31.1 36.9,31.1 84.3,31.1 38,31.2 61.8,31.3 65.6,31.3 48.4,31.4 53.9,31.4 62.9,31.5 64.6,31.5 80.2,31.5 81.6,31.5 69,31.7 55.1,32.1 72.8,32.1 56.6,32.2 71.7,32.2 46.9,32.5 69,32.5 64.435,32.662 20.3,33 21.6,33 48.4,33 65.1,33 71.3,33 72.5,33 27.6,33.2 28.7,33.2 29.9,33.2 32.4,33.4 56.5,33.5 33.5,33.6 46.9,33.6 34.4,33.8 78.9,34.1 59.9,34.4 34.5,34.5 38.4,34.5 59,34.5 42.4,34.7 44.3,34.7 46.5,34.7 40.4,34.8 52.3,34.8 58.1,34.9 53.6,35.2 76.9,35.6 82,35.6 52.3,35.7 76,35.7 44.5,36.3 48.1,36.4 52.3,36.5 77.4,36.6 78.2,36.6 78.9,36.6 66.8,36.8 68,36.8 64.5,36.9 65.2,36.9 65.9,36.9 83.2,37.2 55,37.5 67.7,37.5 68.8,37.5 19.25,38 82.6,38.5 52.4,38.6 78.6,38.6 22.5,38.75 28.25,38.75 46.3,39 71.8,39 77.9,39.1 66.3,39.2 52.4,39.4 25.75,39.5 65.4,39.6 43.1,39.7 46.8,39.7 7.25,39.75 8.5,39.75 13.25,39.75 15.75,39.75 18.75,39.75 28.5,39.75 71.8,39.8 77.9,39.8 14.5,40 30.25,40 40.3,40.1 82.4,40.1 52.4,40.2 53.3,40.2 20.25,40.25 25.5,40.25 65.8,40.3 43.2,40.6 77.9,40.6 79.5,40.6 81.1,40.6 52.4,40.9 53.3,40.9 62.46,40.966 65.1,41 71.8,41.2 40.5,41.3 99,41.4 1.25,41.5 2.75,41.5 4.5,41.5 29.5,41.5 58.6,41.8 16,42 27.25,42 28.25,42 71.3,42.1 7.5,42.25 8.5,42.25 13.25,42.25 14.75,42.25 58.7,42.7 66.2,42.8 3.5,43 4.5,43 5.5,43 6.5,43 65,43 71.6,43.1 95,43.1 52.8,43.2 70.5,43.2 81.3,43.3 69,43.4 56.5,43.5 58.5,43.6 65.9,43.6 53.5,43.7 54.4,43.7 26.75,44 21,44.25 25.5,44.25 82.2,44.5 18.75,45 20.25,45 21.5,45 3.5,45.5 4.5,45.5 5.5,45.5 46,45.8 43.5,45.9 58.6,45.9 60.5,45.9 63.2,46.1 20.75,46.25 27.75,46.25 59.7,46.5 58.7,46.7 81.9,46.7 48.1,46.9 2.5,47 4.5,47.25 20.75,47.25 28.25,47.25 24,47.5 61.8,47.5 63.2,47.6 83.2,47.7 19.75,47.75 26.25,47.75 29,47.75 43.8,47.9 23.25,48 25,48 60.9,48.2 37,48.3 45.9,48.4 58.8,48.4 59.9,48.4 22.25,48.5 56,48.5 19.75,48.75 74.2,48.8 77.1,49 66.5,49.3 67.3,49.4 83.8,49.4 17.75,49.5 28,49.5 29.5,49.5 2.75,49.75 4.5,49.75 19.75,49.75 25.5,49.75 26.25,49.75 31.75,49.75 74.2,49.9 16.75,50 78.3,50 56,50.1 56.8,50.1 57.6,50.1 58.4,50.1 77,50.2 48.4,50.3 82.4,50.4 29.5,50.5 69.6,50.7 70.6,50.7 64.3,50.8 56.8,51 77.2,51.3 82,51.6 64.3,51.7 32,51.75 56.8,51.8 78.3,51.9 18,52 18.75,52 19.5,52 61.2,52.3 69.7,52.3 70.6,52.3 71.6,52.3 72.8,52.3 58,52.4 59,52.4 67.5,52.4 31.25,52.5 65.6,52.5 26.75,52.75 61.9,52.8 64,52.8 19.75,53 59.7,53 31.75,53.25 65.5,53.4 2.25,53.5 27.5,53.5 28.25,53.5 30,53.5 1.25,53.75 3.75,53.75 5,53.75 63,53.8 64.3,53.8 84.4,54 82.3,54.1 83.2,54.1 61,54.2 77.6,54.2 79.8,54.2 72.1,54.4 73.4,54.6 61,55.1 7,55.25 8.75,55.25 12.75,55.25 15.5,55.5 61,55.9 19.5,56.25 79.8,56.7 65.8,56.8 83.55,56.8 17.75,57 84.9,57.2 7.25,57.25 8.25,57.25 19,57.25 13.25,57.5 14.5,57.5 16.25,58 24.25,58 25.5,58 26.75,58 28,58 70.7,58 73.3,58 87,58.1 79.5,58.2 3.5,58.25 4.5,58.25 5.5,58.25 6.5,58.25 7.5,58.25 8.5,58.25 15.25,58.25 22.75,58.25 29.25,58.25 22,58.5 82.35,58.7 84.5,59.1 30.25,59.25 63.8,59.7 31,60 66.5,60.3 67.8,60.3 21.5,60.5 26.25,60.5 27,60.5 27.75,60.5 3.5,60.75 4.5,60.75 5.5,60.75 6.5,60.75 7.5,60.75 8.5,60.75 14,60.75 31.75,60.75 41.25,60.75 16.25,61 19,61 20.75,61 28.5,61 36.25,61.25 46.5,61.25 19.75,61.5 32.5,61.5 81.4,61.6 29.25,61.75 15.75,62 22.25,62 25,62 34.5,62 42,62 70,62.2 1.5,62.25 3.25,62.25 5,62.25 33.25,62.25 24.25,62.5 30,62.5 15.75,62.75 28.5,62.75 48,62.75 22,63 24.25,63.25 26.25,63.25 30.5,63.25 15.75,63.5 29.5,63.5 84.6,63.7 17,64.25 27,64.25 24.25,64.5 1.25,65 3,65 5,65 26.25,65 81,65 82.2,65.2 25.5,65.5 84.6,65.5 143.4,66.25 141.05,66.3 23.25,66.75 25.5,66.75 14.25,67 32.817,67.005 69.2,67.4 29.25,67.5 76.9,67.6 16.5,67.75 36,67.75 37,67.75 14,68 15.25,68 28.5,68 78.1,68.1 46.25,68.25 16.5,68.5 80.9,68.6 27.5,69 33,69 34.25,69 16.5,69.25 31,69.25 46.5,69.25 37.25,69.5 26.75,69.75 35,69.75 16.5,70 17.5,70 18.5,70 20.25,70 13,70.25 14.25,70.25 30,70.25 37.25,70.25 69.3,70.3 7.25,70.5 8.5,70.5 26,70.5 35.5,70.5 87.3,70.7 70.3,70.9 71.1,70.9 72.1,70.9 18.5,71 25.25,71.25 29,71.25 1.25,71.5 2.75,71.5 4.5,71.5 35,71.5 36.75,71.5 84.6,71.6 6,71.75 12,71.75 17.25,71.75 78.8,71.9 18.5,72 24.5,72 28,72.25 87.2,72.4 15.5,72.5 14,72.75 19,72.75 23.5,72.75 27.25,73 3.5,73.25 4.5,73.25 5.5,73.25 6.5,73.25 7.5,73.25 23.25,73.75 26.5,73.75 20.5,74.25 25.75,74.5 39.25,74.5 42.75,74.5 138.55,74.75 25,75 96.15,75.15 93.55,75.65 88.55,75.7 141.45,75.7 3.5,75.75 4.5,75.75 5.5,75.75 6.5,75.75 7.5,75.75 8.5,75.75 26,75.75 29,76 19,76.25 20,76.25 34.25,76.25 26.75,76.5 31.25,76.5 137.45,76.85 27.75,77 1.25,77.25 2.5,77.25 4,77.25 23.25,77.25 31.75,77.75 32.5,77.75 33.5,77.75 34.25,77.75 141.45,77.9 34.75,79 25.25,79.25 26.25,79.5 28.25,79.5 3.75,80 1.25,80.25 26,80.5 28.25,80.5 26,81.5 28.25,81.5 24.5,82 23.5,83 31.5,83 32.25,83.25 97.55,83.35 114.55,83.35 108.9,83.5 29,83.75 31,83.75 1.25,84 2.5,84 4,84 22.5,84 27.5,84 30,84.25 26.25,84.5 109,84.55 114.8,84.65 111.7,84.75 95,84.95 21.5,85 25.25,85 32.5,85.25 7.5,85.5 8.75,85.5 13.25,85.5 15,85.5 111.25,85.7 20.5,86 27.25,86 29.75,86 24,86.25 31.75,86.25 12.5,86.5 98.25,86.65 1.25,86.75 2.5,86.75 4,86.75 111.35,86.95 19.5,87 23,87.25 89.05,87.45 7,87.5 8.25,87.5 13.25,87.5 14.5,87.5 18.25,87.5 111.35,87.8 93.95,87.9 16.25,88 26.25,88 3.5,88.25 4.5,88.25 5.5,88.25 6.5,88.25 7.5,88.25 8.5,88.25 13.5,88.25 15,88.25 22,88.25 22.5,88.75 21,89 109.3,89.05 23.5,89.5 24.5,89.5 20.5,90 22,90 31,90.25 3.5,91 4.5,91 5.5,91 6.5,91 7.5,91 8.5,91 13.75,91 21.75,91 22.75,91 15.25,91.25 16.5,91.25 110.45,91.3 31,91.5 86.3,91.65 33,92 18.25,92.25 80.4,92.25 84.7,92.4 1.25,92.5 2.25,92.5 3.25,92.5 4.25,92.5 6.75,93.75 29,94 29.5,94.5 30.75,94.5 52.75,94.5 23.75,94.75 28.25,94.75 32.75,94.75 93.35,94.85 48.25,95 2,95.25 3.75,95.25 5,95.25 22.75,95.25 77.45,95.25 23.75,95.75 24.75,95.75 30.75,96 48.25,96 39,96.5 93.25,96.5 30.5,97 97.35,97.4 41.25,97.5 41.25,98.5 48.5,98.5 53.5,98.5 43.5,99 41.25,99.25 92.25,99.45 43.5,99.75 50.5,100 88.8,100.05 41.25,100.25 85.5,100.35 43.5,100.75 80.7,104 83.2,104.1 85.6,104.25 64.45,104.3 64.5,105.15 62.85,105.35 64.45,106.3 15,107 34,107 33,107.25 35.75,107.5 15.5,107.75 13.75,108 64.5,108.2 33.75,108.25 13.75,108.75 15.5,108.75 15.5,109.5 64.5,109.5 11.5,109.75 14.25,109.75 17.5,109.75 18.25,110 53.5,110 15.5,110.5 64.5,110.65 14.25,110.75 17.5,110.75 18.75,111 54.5,111.25 15.5,111.5 37,111.5 14.25,111.75 64.5,112.15 35,112.5 36,112.5 37,112.5 83.4,112.8 88.55,112.95 18,113.25 19,113.25 81.1,113.25 34.75,113.5 64.55,113.65 79.15,113.75 62.8,114.2 87.7,114.45 85.1,114.55 64.45,114.9 64.5,116.05 99,117 64.45,117.35 62.85,117.5 97.8,118.1 16.25,118.25 64.45,118.6 56.75,119.5 97,119.5 13.75,119.75 54.5,119.75 15.75,121.25 14,122.25 33.75,122.25 36.75,122.25 91.5,122.9 34.5,123 36,123 64.35,123.3 86.8,123.4 15,123.5 17,123.5 54.75,123.5 90.1,123.5 91,123.5 92,123.5 34.25,124 83.5,124.1 78.1,124.2 79.8,124.2 81.1,124.2 86.8,124.2 64.4,124.45 13.75,124.75 89.4,124.9 34,125 86.8,125.1 56,125.25 19.25,125.75 64.45,125.95 86.8,126 62.85,126.2 16.25,126.75 17,126.75 18,126.75 86.8,126.9 38.75,127.25 64.45,127.4 41,127.5 20,128 16.25,128.25 7.25,128.5 38,128.75 19.75,129 64.45,129.25 89.6,129.4 38.75,129.75 40.75,130 90,130.2 93.3,130.2 38,130.25 20.75,130.5 56.25,130.5 15.5,130.75 57.75,131.25 64.35,131.3 20.75,131.5 15.75,131.75 26.5,131.75 15,132.5 62.85,132.5 20.75,132.75 64.45,133.25 26.5,134.5 28,134.5 55.25,134.5 6,135 29.25,135 64.55,135.15 26.5,135.75 64.3,137.05 62.85,137.25 64.4,138.8 64.1,142.7 67.25,143.05 61.65,145.35 60.5,146.3 64.25,146.4 43.25,146.8 48,146.8 52.75,146.8 24.25,150.25 24,151.25 32.5,151.5 31.2,152.2 23.75,152.25 37.2,152.4 29.2,152.9 20.25,153 32.2,153.3 46.25,153.75 37.1,153.8 28.8,154.1 39.25,154.25 41.75,155 28.8,155.2 30,155.2 35.4,155.2 38.75,155.25 34.2,155.3 19,155.5 44,155.6 45.5,155.6 33.1,156.1 33.1,157.2 32.2,157.3 30.5,158.2 31.4,158.2 32.3,158.2 33.1,158.2 21,159 19.25,159.25
GND_HallIso: C1-45.2 C5-25.2 C8-16.1 HHall1.4 OpAmp-1.2 OpAmp-1.8 | length 22.2
  Top Layer w0.4: OpAmp-1.8@71.25,176.585 70.285,176.585 69.9,176.2 69.9,173.009 70.134,172.775 OpAmp-1.2@71.25,172.775 73.625,172.775 C8-16.1@74.534,171.866 ; C5-25.2@74.55,168.15 74.534,168.166 74.534,169.466 74.1,169.9 73.9,169.9 73.65,170.15 C1-45.2@73.65,170.35 C1-45.2@73.65,170.55 ; C8-16.1@74.55,172.05 74.534,172.034 C8-16.1@74.534,171.866 ; v1(74.8,170.4) 73.8,170.4 C1-45.2@73.65,170.55 ; C1-45.2@73.65,170.55 73.9,170.8 74.1,170.8 74.534,171.234 C8-16.1@74.534,171.866
  Bottom Layer w0.4: v1(74.8,170.4) 76.49,168.71 HHall1.4@80.35,168.71
GND_IN: C1-1.2 C1-3.2 C2-1.2 H1.12 H1.15 H1.16 Iso-1.1 Iso-1.7 Iso-2.8 | length 59.8
  Top Layer w0.2: 34.04,174.25 38.98,174.25 ; 38.98,174.3 H1.12@40.32,172.96
  Top Layer w0.3: H1.15@32.7,172.96 34.04,174.3 ; 35.11,169.89 Iso-1.7@35.11,166.7 35.11,165.19 35.25,165.05
  Top Layer w0.4: Iso-2.8@20.07,166.7 20.07,165.284 20.304,165.05 35.25,165.05 42.496,165.05 42.73,165.284 Iso-1.1@42.73,166.7 ; C1-1.2@31.42,169.1 31.42,171.7 H1.16@30.16,172.96 H1.15@32.7,172.96 ; H1.15@32.968,172.692 32.968,172.032 35.11,169.89 ; H1.12@40.32,172.96 42.52,170.76 C1-3.2@42.52,169 42.52,167.61 42.73,167.4 Iso-1.1@42.73,166.7 ; C2-1.2@45.22,166.9 45.02,166.7 Iso-1.1@42.73,166.7
HallN: CLC-8.2 Con_S.5 | length 21.1
  Top Layer w0.2: Con_S.5@35.6,3.6 35.6,2.317 35.717,2.2 36.9,2.2 37.263,2.563 37.562,2.563 37.921,2.921 40.025,4.175 43.975,8.125 46.925,8.125 49.762,10.962 CLC-8.2@49.762,13.075
HallP: CLC-7.2 Con_S.9 | length 27
  Top Layer w0.2: Con_S.9@34.6,3.6 34.6,1.45 35.55,0.5 40.3,0.5 43.85,4.05 45.65,4.05 52.7,11.1 CLC-7.2@52.7,13.075
HallRefN: ADC2.31 C8-9.1 C9-5.2 R12-8.2 | length 17.4
  Top Layer w0.2: 74.15,51.9 ADC2.31@74.15,61.8
  Top Layer w0.3: C8-9.1@70.95,47.5 R12-8.2@73.133,47.5 73.133,48.424 72.958,48.6 72.95,48.6 72.6,48.95 C9-5.2@72.6,49.4 72.868,49.668 72.868,50.618 74.15,51.9
HallRefP: ADC2.32 C8-8.1 C9-5.1 R12-7.2 | length 17
  Top Layer w0.3: ADC2.32@74.7,61.8 75.65,60.85 ; 75.6,60.85 C9-5.1@75.6,49.4 75.317,49.117 R12-7.2@75.317,47.5 C8-8.1@77.5,47.5
HallS: CLC-9.2 Con_S.7 | length 23.6
  Top Layer w0.2: Con_S.7@35.1,3.6 35.1,1.867 35.217,1.75 37.425,1.75 38.196,2.521 40.3,3.775 40.558,3.775 41.883,5.1 45.25,5.1 51.231,11.081 CLC-9.2@51.231,13.075
HallSignal: ADC2.3 C8-10.1 C9-6.1 R12-9.2 | length 14.3
  Top Layer w0.2: ADC2.3@76,64.15 78,64.15 78.9,63.25 78.9,60.15 80.8,58.25 80.8,57.75 C9-6.1@81.2,57.35
  Top Layer w0.3: C9-6.1@81.2,57.35 81.2,55.55 80.9,55.25 C8-10.1@82.9,55.25
HallSignalBias: ADC2.2 C8-11.1 C9-6.2 R12-10.2 | length 12.2
  Top Layer w0.2: ADC2.2@76,63.65 77.45,63.65 78.2,62.9 C9-6.2@78.2,57.35
  Top Layer w0.3: C8-11.1@76.9,55.25 78.7,55.25 78.4,55.55 78.4,55.75 78.2,55.95 C9-6.2@78.2,57.35
HB\: N1.4 PWM1.23 | length 23.2
  Top Layer w0.2: N1.4@84.15,135.05 84.15,133.65 82.75,132.25 79.7,132.25 76.6,129.15 76.6,125.4 77.05,124.95 PWM1.23@85,124.95
HB_IN: H1.14 Iso-2.5 | length 19.7
  Top Layer w0.2: v1(23.7,171.9) 23.7,171.792 23.9,171.592 23.9,166.72 Iso-2.5@23.88,166.7
  Bottom Layer w0.2: v1(23.7,171.9) 23.777,171.977 23.777,172.194 23.8,172.217 23.8,174.1 23.95,174.25 34.25,174.25 35.24,173.26 H1.14@35.24,172.96
MISO: ADC2.12 Iso-2.10 | length 134.6
  Top Layer w0.2: Iso-2.10@21.34,157.2 21.34,151.76 24.15,148.95 65.05,148.95 73.15,140.85 ADC2.12@73.15,68
MISO0: H1.19 Iso-2.7 | length 6.8
  Top Layer w0.3: Iso-2.7@21.34,166.7 21.3,166.74 21.3,171.72 H1.19@22.54,172.96
MOSI: ADC2.10 Iso-2.15 | length 129.6
  Top Layer w0.2: Iso-2.15@27.69,157.2 27.69,152.96 30.6,150.05 66.75,150.05 74.15,142.65 ADC2.10@74.15,68
MOSI0: H1.20 Iso-2.2 | length 12.4
  Top Layer w0.3: v1(27.6,170.4) 27.6,170.319 27.69,170.229 Iso-2.2@27.69,166.7
  Bottom Layer w0.3: H1.20@20,172.96 22.06,170.9 27.1,170.9 v1(27.6,170.4)
MX1: Mux1.17 Mux2.17 PWM1.20 | length 159.2
  Top Layer w0.2: v1@24.65,23.4 v1(24.65,23.45) 24.65,23.5 24.8,23.65 Mux1.17@24.8,25.15 ; v1(24.75,13.35) Mux2.17@24.75,15 ; v1(26,35.6) 26.077,35.523 26.077,35.117 26.194,35 30.3,35 31.6,36.3 33.9,36.3 38.9,41.3 38.9,48.7 52,61.8 52,65.8 64.2,78 64.2,78.3 66.2,80.3 66.2,122.1 v1(71.7,127.6) ; v1(78.2,127.5) 78.3,127.5 78.9,126.9 PWM1.20@85,126.9
  Bottom Layer w0.2: v1(24.65,23.45) 24,24.1 24,25.9 23.5,26.4 23.5,34.9 24.2,35.6 v1(26,35.6) ; v1@24.699,23.449 23.05,21.8 23.05,18.35 24.75,16.65 v1(24.75,13.35) ; v1(71.7,127.6) 71.777,127.523 71.994,127.523 72.017,127.5 76.892,127.5 76.915,127.523 78.177,127.523 v1(78.2,127.5)
MX2: Mux1.16 Mux2.16 PWM1.21 | length 159.5
  Top Layer w0.2: v1(22.9,35.7) 24.7,35.7 25.9,34.5 30.5,34.5 31.8,35.8 34,35.8 39.3,41.1 39.3,48.5 52.4,61.6 52.4,65.617 64.6,77.817 64.6,78 66.6,80 66.6,121.5 v1(71.8,126.7) ; v1(23.35,23.5) 23.4,23.55 23.8,23.55 24.15,23.9 Mux1.16@24.15,25.15 ; v1(23.85,13.45) 24.1,13.7 Mux2.16@24.1,15 ; v1(78.05,126.6) 78.158,126.6 78.307,126.451 78.349,126.451 78.55,126.25 PWM1.21@85,126.25
  Bottom Layer w0.2: v1(22.9,35.7) 22.9,26.2 23.6,25.5 23.6,23.817 23.35,23.567 v1(23.35,23.5) 22.55,22.7 22.55,18.15 23.85,16.85 v1(23.85,13.45) ; v1(71.8,126.7) 71.877,126.623 72.094,126.623 72.117,126.6 76.892,126.6 76.915,126.623 78.027,126.623 v1(78.05,126.6)
MX3: Mux1.15 Mux2.15 PWM1.22 | length 154.4
  Top Layer w0.2: v1(22.2,35) 24.8,35 25.8,34 31.1,34 32.5,35.4 34.2,35.4 39.7,40.9 39.7,48.3 52.8,61.4 52.8,65.3 65,77.5 65,77.8 67,79.8 67,120.9 v1(71.8,125.7) ; v1(22.85,25.1) Mux1.15@23.45,25.1 ; v1(23,15) Mux2.15@23.45,15 ; v1@78.1,125.55 78.15,125.6 PWM1.22@85,125.6
  Bottom Layer w0.2: v1(22.2,35) 22.2,25.75 v1(22.85,25.1) 22.1,24.35 22.1,17.95 23.15,16.9 23.15,15.258 23,15.108 v1(23,15) ; v1(71.8,125.7) 71.877,125.777 72.094,125.777 72.117,125.8 77.783,125.8 78.033,125.55 v1@78.1,125.55
  other v1: 78.05,125.6
NetADC1_10: ADC1.10 C3-21.2 C4-10.2 R5-1.1 R6-1.1 | length 9.2
  Top Layer w0.3: ADC1.10@39.7,99 39.7,97.3 40.4,96.6 42.2,96.6 42.4,96.4 42.4,93.8 R5-1.1@42.6,93.6 R6-1.1@44.1,93.6
NetADC2_6: ADC2.6 C8-4.1 C9-2.1 R12-3.2 | length 10.4
  Top Layer w0.2: ADC2.6@76,65.65 79.85,65.65 80.717,66.517 80.717,66.8 81.117,67.2 C9-2.1@81.4,67.2
  Top Layer w0.3: C9-2.1@81.4,67.2 81.85,67.2 82.2,67.55 82.2,67.641 82.376,67.817 R12-3.2@83.45,67.817 C8-4.1@83.45,65.95
NetADC2_7: ADC2.7 C8-5.1 C9-2.2 R12-4.2 | length 12
  Top Layer w0.2: ADC2.7@76,66.15 78.45,66.15 79.4,67.1 79.4,69 80.267,69.867 81.067,69.867 C9-2.2@81.4,70.2
  Top Layer w0.3: C9-2.2@81.4,70.2 82.933,70.2 82.95,70.183 83.15,70.183 83.45,69.883 C8-5.1@83.45,71.55
NetADC2_18: ADC2.18 R1-13.1 | length 4.5
  Top Layer w0.2: R1-13.1@68,68.3 67.95,68.3 67.6,67.95 67.6,67.883 67.55,67.833 67.55,66.267 67.667,66.15 ADC2.18@69.8,66.15
NetADC2_23: ADC2.23 C7-2.1 | length 7.5
  Top Layer w0.2: C7-2.1@63.8,60.95 63.8,61.6 64.85,62.65 67.2,62.65 68.2,63.65 ADC2.23@69.8,63.65
NetADC2_29: ADC2.29 C8-2.1 C9-1.1 R12-1.2 | length 10.8
  Top Layer w0.2: C9-1.1@69.1,57.5 69.1,57.95 69.5,58.35 69.7,58.35 70.65,59.3 71.95,59.3 73.15,60.5 ADC2.29@73.15,61.8
  Top Layer w0.4: C8-2.1@66.75,55.65 R12-1.2@68.6,55.65 68.6,56.55 69.1,57.05 C9-1.1@69.1,57.5
NetADC2_30: ADC2.30 C8-3.1 C9-1.2 R12-2.2 | length 8.8
  Top Layer w0.2: C9-1.2@72.1,57.5 72.5,57.9 72.5,58.55 73.65,59.7 ADC2.30@73.65,61.8
  Top Layer w0.4: R12-2.2@70.5,55.65 C8-3.1@72.4,55.65 72.4,57.2 C9-1.2@72.1,57.5
NetBuf1_4: Buf1.4 RFS1.1 | length 2.3
  Top Layer w0.5: RFS1.1@112.75,83.5 112.75,83.7 113.2,84.15 113.2,85.65
NetC1-11_1: C1-11.1 C3-13.1 RF_Mag_1.9 | length 2.9
  Top Layer w0.3: RF_Mag_1.9@26.775,94.9 26.775,95.225 27.15,95.6 C3-13.1@27.6,95.6 C1-11.1@27.6,97.2
NetC1-12_1: C1-12.1 C3-14.1 RF_Mag_2.9 | length 3.4
  Top Layer w0.3: RF_Mag_2.9@22.725,64.625 RF_Mag_2.9@22.4,64.625 22.4,63.8 23,63.2 23,63 23.2,62.8 C3-14.1@23.2,61.9
NetC1-13_1: C1-13.1 C3-15.1 RF_Mag_3.9 | length 2.7
  Top Layer w0.3: RF_Mag_3.9@25.725,50.825 28.275,50.825 C1-13.1@28.4,50.7
NetC1-14_1: C1-14.1 C3-16.1 RF_Mag_4.9 | length 3.5
  Top Layer w0.3: RF_Mag_4.9@24.6,44.5 24.6,44.825 24.9,45.125 ; C3-16.1@24.9,45.9 24.9,45.125 ; C1-14.1@26.8,45 26.675,45.125 24.9,45.125
NetC1-19_1: C1-19.1 C5-9.2 CE3-4.1 D2.2 I2.1 VReg-1.9 VReg-1.10 VReg-1.11 | length 36.8
  Top Layer w1: 116.45,91.95 116.45,94.53 VReg-1.10@121.05,99.13
  Top Layer w5: VReg-1.10@121.05,99.13 125.92,99.13 128.85,96.2 ; I2.1@127.35,108.5 127.35,107.1 130.05,104.4 128.85,103.2 128.85,96.2 ; CE3-4.1@133.6,96.2 128.85,96.2
NetC3-2_2: C3-2.2 RF_Mag_1.15 | length 1.7
  Top Layer w0.3: C3-2.2@22.1,92.3 22.15,92.3 22.325,92.475 RF_Mag_1.15@23.7,92.475
NetC3-3_2: C3-3.2 RF_Mag_1.14 | length 1.8
  Top Layer w0.3: C3-3.2@22.2,93.8 22.2,93.75 22.825,93.125 RF_Mag_1.14@23.7,93.125
NetC3-5_2: C3-5.2 RF_Mag_2.15 | length 1.6
  Top Layer w0.3: C3-5.2@19.5,69.1 19.55,69.1 19.975,68.675 RF_Mag_2.15@19.975,67.7
NetC3-6_2: C3-6.2 RF_Mag_2.14 | length 1.6
  Top Layer w0.3: RF_Mag_2.14@20.625,67.7 20.65,67.725 20.65,68.65 20.95,68.95 20.95,69 21.05,69.1 C3-6.2@21.1,69.1
NetC3-8_2: C3-8.2 RF_Mag_3.15 | length 1.7
  Top Layer w0.3: C3-8.2@23.1,55.5 23.1,54.8 23.275,54.625 23.275,53.925 RF_Mag_3.15@23.3,53.9
NetC3-9_2: C3-9.2 RF_Mag_3.14 | length 1.7
  Top Layer w0.3: RF_Mag_3.14@23.95,53.9 23.975,53.925 23.975,54.575 24.1,54.7 C3-9.2@24.1,55.5
NetC3-11_2: C3-11.2 RF_Mag_4.15 | length 1.7
  Top Layer w0.3: C3-11.2@19.9,41.9 20,42 20.5,42 20.575,42.075 RF_Mag_4.15@21.525,42.075
NetC3-12_2: C3-12.2 RF_Mag_4.14 | length 1.8
  Top Layer w0.3: C3-12.2@19.9,43.1 19.9,43.05 20,42.95 20.45,42.95 20.675,42.725 RF_Mag_4.14@21.525,42.725
NetC3-17_2: C3-17.2 RF_PM_1.2 | length 3.4
  Top Layer w0.4: C3-17.2@29.9,82.8 29.9,82.75 30.75,81.9 31.1,81.9 31.2,81.8 RF_PM_1.2@32.9,81.8
NetC3-18_2: C3-18.2 RF_PM_1.3 | length 3
  Top Layer w0.4: C3-18.2@29.9,81.2 29.95,81.15 RF_PM_1.3@32.9,81.15
NetC3-19_2: C3-19.2 RF_PM_1.5 | length 3
  Top Layer w0.4: C3-19.2@29.9,79.8 29.95,79.85 RF_PM_1.5@32.9,79.85
NetC3-20_2: C3-20.2 RF_PM_1.6 | length 3.4
  Top Layer w0.4: C3-20.2@29.9,78.2 29.9,78.25 29.95,78.3 30.4,78.3 31.3,79.2 RF_PM_1.6@32.9,79.2
NetC3-23_2: C3-23.2 RF_PM_2.2 | length 3.2
  Top Layer w0.3: C3-23.2@34.8,67.8 34.8,67.75 35.35,67.2 35.35,67.15 35.85,66.65 RF_PM_2.2@37.5,66.65
NetC3-24_2: C3-24.2 RF_PM_2.3 | length 2.7
  Top Layer w0.3: C3-24.2@34.8,66.1 34.9,66 RF_PM_2.3@37.5,66
NetC3-25_2: C3-25.2 RF_PM_2.5 | length 2.7
  Top Layer w0.3: C3-25.2@34.8,64.6 34.85,64.65 37.45,64.65 RF_PM_2.5@37.5,64.7
NetC3-26_2: C3-26.2 RF_PM_2.6 | length 3.1
  Top Layer w0.3: C3-26.2@34.8,63.2 35.2,63.2 36.05,64.05 RF_PM_2.6@37.5,64.05
NetC3-28_1: C3-28.1 Opa2-3.3 RD-1.3 | length 4.3
  Top Layer w0.3: C3-28.1@70.3,31.8 71.63,30.47 71.63,30.77 RD-1.3@71.7,30.7 73.475,30.7 Opa2-3.3@73.675,30.9
NetC3-29_1: C3-29.1 Opa2-5.3 RD-2.3 | length 3.7
  Top Layer w0.3: Opa2-5.3@65.55,33.9 65.775,33.9 65.9,33.775 C3-29.1@65.9,32.2 65.95,32.15 RD-2.3@67.65,32.15
NetC3-30_1: C3-30.1 Opa2-6.3 RD-3.3 | length 6.5
  Top Layer w0.3: C3-30.1@58.15,33.15 58.2,33.15 58.45,32.9 RD-3.3@59.4,32.9 59.574,32.726 60.074,32.726 60.6,32.2 62.5,32.2 62.9,32.6 Opa2-6.3@62.9,33.8
NetC3-31_1: C3-31.1 Opa2-7.3 RD-5.3 | length 7.1
  Top Layer w0.3: C3-31.1@61.2,43.1 61.2,43.05 61.1,42.95 61.05,42.95 60.524,42.424 60.074,42.424 RD-5.3@59.85,42.2 60.85,42.2 61.8,41.25 61.8,40.3 62.2,39.9 Opa2-7.3@63.7,39.9
NetC3-32_1: C3-32.1 Opa2-8.3 RD-6.3 | length 6.1
  Top Layer w0.3: RD-6.3@54.5,38.7 54.5,39.95 C3-32.1@54.45,40 54.5,40 54.7,40.2 55.2,40.2 55.6,40.6 57.274,40.6 57.45,40.776 57.45,40.85 57.494,40.894 57.494,42.094 Opa2-8.3@57.55,42.15
NetC4-1_2: C4-1.2 RF_Mag_1.5 | length 2.5
  Top Layer w0.3: RF_Mag_1.5@27.9,91.825 29.175,91.825 29.9,91.1 C4-1.2@29.9,90.9
NetC4-2_2: C4-2.2 RF_Mag_2.5 | length 2.8
  Top Layer w0.3: C4-2.2@16.9,62.9 16.9,63.1 17.3,63.5 RF_Mag_2.5@19.325,63.5
NetC4-3_2: C4-3.2 RF_Mag_3.5 | length 2.2
  Top Layer w0.3: C4-3.2@20.9,48.9 20.9,49.1 21.2,49.4 21.4,49.4 21.7,49.7 RF_Mag_3.5@22.65,49.7
NetC4-4_2: C4-4.2 RF_Mag_4.5 | length 2.3
  Top Layer w0.3: RF_Mag_4.5@25.725,41.425 26.05,41.425 26.8,40.675 26.8,40.2 C4-4.2@27.1,39.9
NetC4-5_1: C4-5.1 RF_PM_1.14 | length 2.2
  Top Layer w0.3: RF_PM_1.14@38.7,82.45 C4-5.1@38.7,84.6
NetC4-6_2: C4-6.2 RF_PM_1.8 | length 2.3
  Top Layer w0.3: C4-6.2@38.7,76.2 RF_PM_1.8@38.7,78.55
NetC4-7_1: C4-7.1 RF_PM_2.14 | length 2.1
  Top Layer w0.3: C4-7.1@43.2,69.4 43.3,69.3 RF_PM_2.14@43.3,67.3
NetC4-8_2: C4-8.2 RF_PM_2.8 | length 1.8
  Top Layer w0.3: RF_PM_2.8@43.3,63.4 43.3,61.7 C4-8.2@43.4,61.6
NetC5-5_2: C5-5.2 C5-6.2 CE2-1.1 F-1.2 H2.3 H2.4 TVS1.2 | length 25.9
  Top Layer w1: C5-6.2@127.65,19.15 130.85,19.15 130.9,19.1
  Top Layer w5: 127.5,24.95 129.35,23.1 129.5,23.1 CE2-1.1@132.95,26.55 ; 130.9,15.05 130.9,19.1 130.9,24.05 ; 132,16.5 H2.3@133.8,16.5 H2.4@138,16.5
NetC5-7_2: C5-7.2 C5-8.2 CE3-2.1 CE3-3.1 D2.1 I1.2 VReg-1.1 VReg-1.2 VReg-1.3 VReg-1.4 | length 50.6
  Top Layer w1: D2.1@116.3,89.75 116.65,89.75 116.7,89.7 116.7,89.45 118.9,87.25 118.9,85.75 120.36,84.29 120.434,84.29 120.834,83.89 VReg-1.4@121.05,83.89
  Top Layer w5: 121.494,82.422 122,81.916 122,77.7 122.1,77.6 131.95,77.6 ; I1.2@123.95,66.8 131.5,66.8 CE3-3.1@133.6,68.9 131.95,70.55 131.95,77.6 ; CE3-2.1@133.6,84.45 131.95,82.8 131.95,77.6
NetC5-12_2: C5-12.2 VReg-2.5 VReg-2.6 | length 4.7
  Top Layer w0.6: C5-12.2@94.4,86.5 94.6,86.7 95.4,86.7 97.168,88.468 VReg-2.6@97.168,89.565
NetC5-13_2: C5-13.2 VReg-3.5 VReg-3.6 | length 4.8
  Top Layer w1: VReg-3.6@97.45,45.13 VReg-3.5@97.45,43.86 97.65,44.06 98.45,44.06 98.59,44.2 C5-13.2@100.8,44.2
NetC5-14_1: C5-14.1 VReg-4.5 VReg-4.6 | length 3.4
  Top Layer w1: VReg-4.6@97.168,102.376 VReg-4.5@97.168,101.106 97.168,99.1 C5-14.1@97.3,99.1
NetC6-1_1: C6-1.1 C6-2.1 VReg-2.1 | length 4.4
  Top Layer w1: VReg-2.1@91.368,92.105 91.422,92.105 91.622,92.305 91.622,93.772 91.7,93.85 C6-2.1@91.7,94.3 C6-1.1@91.7,96.35
NetC6-6_2: C6-6.2 CE3-6.1 VReg-2.3 | length 10.8
  Top Layer w0.6: C6-6.2@88.7,89 89.15,89 89.35,89.2 89.35,89.214 89.701,89.565 VReg-2.3@91.368,89.565
  Top Layer w1: CE3-6.1@82.4,91.4 82.4,90.3 82.9,89.8 84,89.8 84.8,89 C6-6.2@88.7,89
NetC6-7_1: C6-7.1 C6-8.1 VReg-3.1 | length 6.5
  Top Layer w1: VReg-3.1@91.65,47.67 92.05,47.67 92.25,47.87 92.25,48.401 93.499,49.65 93.499,50.1 C6-7.1@93.949,50.1 C6-8.1@96.55,50.1
NetC6-11_2: C6-11.2 CE3-7.1 VReg-3.3 | length 8.5
  Top Layer w1: CE3-7.1@91.65,40.65 91.65,41.75 91.15,42.25 90.2,42.25 89.6,42.85 89.15,42.85 C6-11.2@89.15,43.3 89.15,44.544 89.736,45.13 VReg-3.3@91.65,45.13
NetC6-14_1: C6-14.1 C6-15.1 VReg-4.1 | length 7.1
  Top Layer w0.5: VReg-4.1@91.368,104.916 92.038,104.916 92.084,104.962 92.084,105.307 92.377,105.6 92.983,105.6 93.733,106.35 93.733,106.8 93.983,107.05 C6-15.1@94.433,107.05 C6-14.1@97.1,107.05